# Altium PCB PCB.PcbDoc (part 4 of 5)
Units mm, origin at the board's own origin, x right, y up, seen from the top; angles counter-clockwise.
Board outline 101.6 x 53.34 mm, 6 copper layers (Top Layer, Int1 (GND), Int2, Int3, Int4 (GND), Bottom Layer), stack 1.625 mm thick; 228 components, 228 nets, 1016 pads, 995 vias.
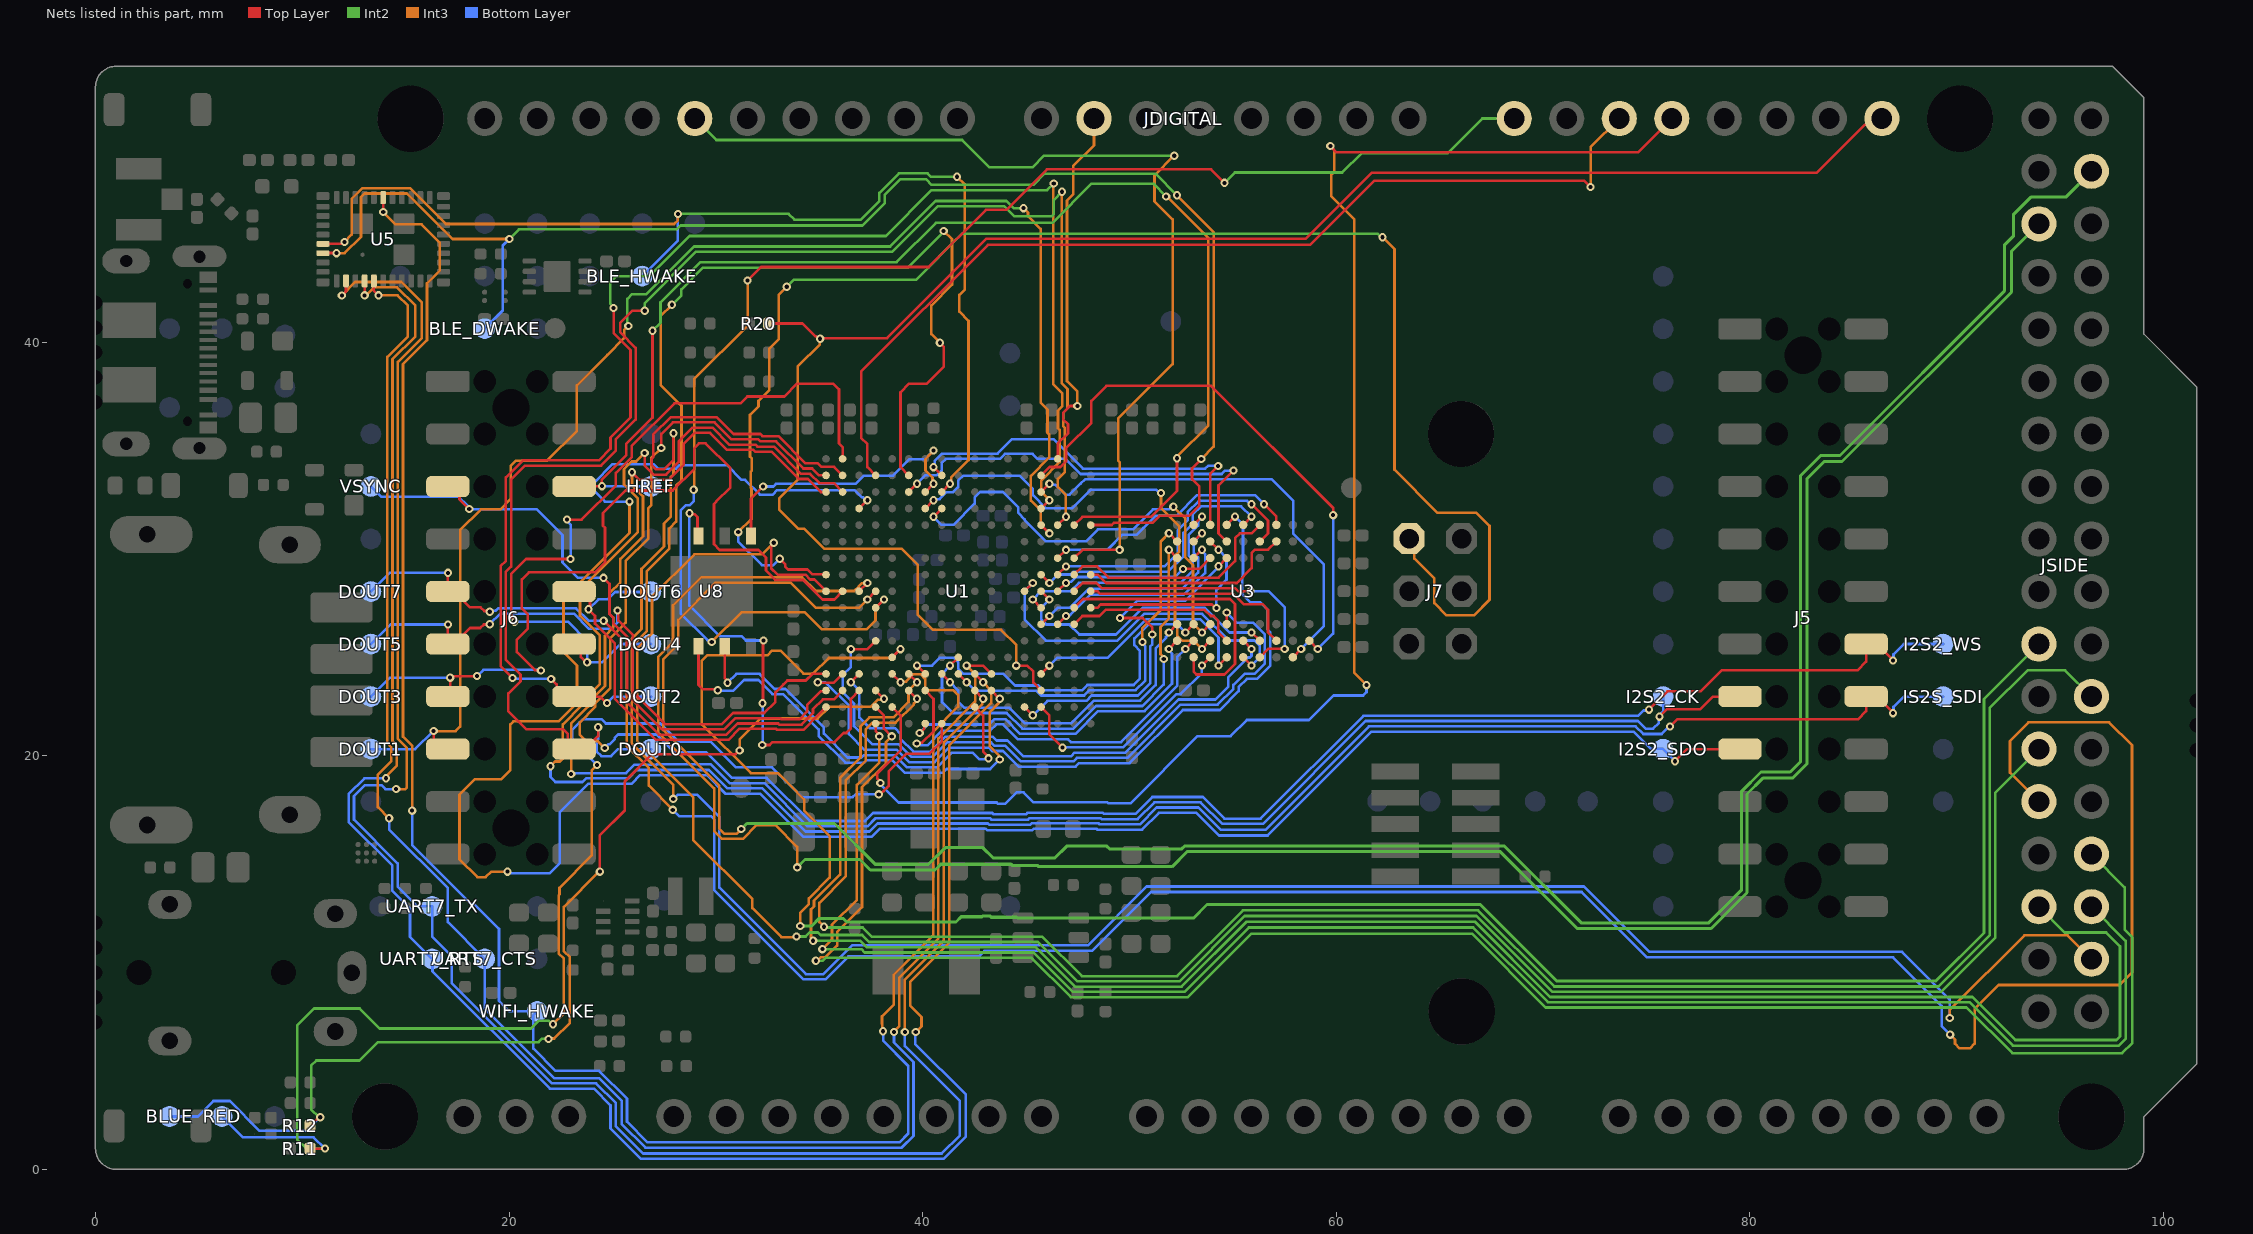
[diagram p8: the nets of this part, all layers, seen from the top]

## Via types
v1: diameter 0.4, hole 0.2, Top Layer to Bottom Layer, tented both sides, 995 vias

## Nets (pads, with @x,y where several pads share a name; then routed paths per layer and width w, separated by ;. In a path a pad name is that pad's centre, name@x,y a point inside that pad or via, vN(x,y) a via of type N, cw(c..) or ccw(c..) an arc to the next point about the centre after c; other vN are vias at no path point) (continued)
PD13: JDIGITAL.12 U1.R17 | length 18
  Top Layer w0.127: U1.R17@46.526,34.353 46.526,35.087 47.026,35.587 47.026,36.031 46.798,36.259 46.798,36.582 47.129,36.913 v1(47.482,36.913)
  Int3 w0.127: v1(47.482,36.913) 47.482,37.613 46.982,38.113 46.982,46.847 47.282,47.147 47.282,48.513 48.286,49.517 JDIGITAL.12@48.286,50.813
PD14_5: U1.P16 U3.A8 | length 27.1
  Top Layer w0.127: U1.P16@45.726,33.553 46.132,33.958 46.663,33.958 46.951,34.246 46.951,34.893 48.154,36.096 48.154,37.159 48.883,37.888 53.951,37.888 59.85,31.99 v1(59.85,31.633) ; U3.A8@58.704,25.56 v1(59.104,25.16)
  Bottom Layer w0.127: v1(59.104,25.16) 59.85,25.906 v1(59.85,31.633)
PD15_5: U1.P15 U3.B9 | length 22.1
  Top Layer w0.127: U1.P15@45.726,32.753 v1(46.126,33.153) ; U3.B9@57.904,24.76 v1(58.304,25.16)
  Bottom Layer w0.127: v1(46.126,33.153) 46.178,33.101 46.426,33.101 46.902,32.625 47.113,32.625 47.641,33.153 47.854,33.367 52.473,33.367 ; 52.473,33.366 56.881,33.366 57.913,32.334 57.913,30.747 59.404,29.257 59.404,26.26 v1(58.304,25.16)
PE0_5: U1.C4 U3.E8 | length 26.1
  Top Layer w0.127: v1(36.526,23.553) U1.C4@36.926,23.953 ; U3.E8@55.504,25.56 v1(55.904,25.16)
  Bottom Layer w0.127: v1(36.526,23.553) 36.936,23.144 36.936,21.84 37.441,21.334 38.658,21.334 38.936,21.056 38.936,20.817 39.555,20.198 40.374,20.198 41.098,20.921 43.384,20.921 43.571,20.734 44.104,20.734 44.859,19.98 47.187,19.98 47.354,20.147 49.799,20.147 52.372,22.72 54.161,22.72 54.773,23.332 54.773,23.781 55.742,24.75 55.829,24.75 55.904,24.825 v1(55.904,25.16)
PE1_5: U1.B4 U3.F1 | length 37.3
  Top Layer w0.127: v1(34.926,23.553) 34.951,23.528 35.702,23.528 U1.B4@36.126,23.953 ; U3.F1@54.704,31.16 v1(55.104,31.56)
  Bottom Layer w0.127: v1(34.926,23.553) 34.933,23.56 35.288,23.56 36.428,22.42 36.428,21.051 37.198,20.281 38.754,20.281 39.345,19.69 40.584,19.69 41.284,20.389 43.198,20.389 43.36,20.227 43.385,20.227 43.386,20.226 43.884,20.226 44.638,19.472 47.397,19.472 47.564,19.639 50.01,19.639 52.583,22.212 54.372,22.212 55.281,23.121 55.281,23.315 55.682,23.715 56.171,23.715 56.802,24.347 56.802,25.973 56.693,26.082 56.693,27.049 56.319,27.423 55.838,27.423 55.463,27.798 55.463,28.644 55.49,28.671 55.49,31.173 v1(55.104,31.56)
PE2_5: U1.C3 U8.3 | length 21.8
  Top Layer w0.127: v1(28.722,31.723) 28.774,31.67 28.982,31.67 29.113,31.54 29.113,30.671 U8.3@29.161,30.623 ; v1(32.242,20.515) 32.605,20.515 32.746,20.657 35.745,20.657 36.183,21.095 36.297,21.095 36.526,21.323 36.526,22.753 U1.C3@36.922,23.149 ; v1(32.259,22.539) 32.279,22.559 32.279,25.552 v1(32.3,25.572)
  Bottom Layer w0.127: v1(28.722,31.723) 28.722,27.257 30.206,25.773 31.252,25.773 31.453,25.572 v1(32.3,25.572) ; v1(32.242,20.515) 32.259,20.532 v1(32.259,22.539)
PE3: BLUE.X R12.2 U1.D3 | length 53.3
  Top Layer w0.127: R12.2@10.375,2.108 10.409,2.108 10.818,2.516 v1(10.867,2.516) ; v1(24.389,14.392) 24.389,16.154 25.594,17.36 25.594,18.745 26.919,20.071 30.958,20.071 31.138,20.25 v1(31.15,20.25) ; U1.D3@37.726,23.153 v1(38.126,22.753)
  Int2 w0.127: v1(10.867,2.516) 10.798,2.516 10.43,2.884 10.43,5.011 10.68,5.261 12.761,5.261 13.65,6.15 21.422,6.15 21.577,6.304 v1(21.904,6.304)
  Int3 w0.127: v1(21.904,6.304) 21.925,6.325 22.182,6.325 22.936,7.079 22.936,10.257 22.65,10.543 22.65,12.694 24.348,14.392 v1(24.389,14.392) ; v1(31.15,20.25) 31.15,20.792 32.157,21.798 34.922,21.798 35.486,22.362 37.488,22.362 37.827,22.701 38.075,22.701 v1(38.126,22.753)
  Bottom Layer w0.127: BLUE.X@3.582,2.553 4.953,2.553 5.7,3.3 6.5,3.3 7.938,1.862 10.213,1.862 v1(10.867,2.516)
PE4: JSIDE.30 U1.D2 | length 92.6
  Top Layer w0.127: U1.D2@37.726,22.353 38.126,21.953 38.126,21.314 v1(38.503,20.937)
  Int2 w0.127: v1(34.836,10.081) 35.163,10.081 35.31,10.227 45.26,10.227 47.165,8.323 52.823,8.323 55.897,11.397 66.555,11.397 70.128,7.825 90.48,7.825 92.689,5.615 98,5.615 98.5,6.115 98.5,11.215 98.126,11.589 98.126,13.633 JSIDE.30@96.52,15.239
  Int3 w0.127: v1(34.836,10.081) 34.909,10.081 35.082,10.254 35.312,10.254 35.868,10.811 35.868,11.473 37.068,12.673 37.068,18.476 38.226,19.635 38.226,20.66 v1(38.503,20.937)
PE5: JSIDE.32 U1.D1 | length 86.9
  Top Layer w0.127: U1.D1@37.726,21.553 37.726,21.185 37.903,21.008 v1(37.903,20.937)
  Int2 w0.127: v1(35.15,10.644) 37.036,10.644 37.199,10.481 45.366,10.481 47.27,8.577 52.658,8.577 55.775,11.693 66.619,11.693 70.233,8.079 90.617,8.079 92.72,5.976 97.84,5.976 98.177,6.312 98.177,11.042 JSIDE.32@96.52,12.699
  Int3 w0.127: v1(35.15,10.644) 35.614,11.109 35.614,11.829 36.814,13.029 36.814,18.581 37.903,19.671 v1(37.903,20.937)
PE6: JSIDE.21 U1.E5 | length 103.5
  Top Layer w0.127: U1.E5@38.526,24.753 v1(38.926,25.153)
  Int2 w0.15: v1(34.082,11.767) 34.631,11.767 34.995,12.131 36.149,12.131 36.322,11.958 41.609,11.958 41.863,12.211 42.868,12.211 42.914,12.258 43.247,12.258 43.317,12.188 44.536,12.188 44.579,12.144 53.095,12.144 53.752,12.801 66.964,12.801 70.652,9.113 89.005,9.113 91.322,11.429 91.322,22.74 JSIDE.21@93.98,25.399
  Int3 w0.127: v1(34.082,11.767) 34.082,12.409 34.492,12.818 34.492,13.098 35.5,14.106 35.5,16.109 34.271,17.338 34.271,17.888 33.933,18.226 33.933,18.236 33.109,19.059 33.099,19.059 33.001,19.158 31.691,19.158 29.311,21.537 29.311,24.591 29.576,24.856 32.5,24.856 32.723,25.079 33.127,25.079 34.236,23.97 34.708,23.97 35.461,24.723 38.496,24.723 v1(38.926,25.153)
PE7_5: U1.U9 U3.C8 | length 10.6
  Top Layer w0.127: U1.U9@48.126,27.953 48.445,27.953 48.562,27.836 55.017,27.836 55.522,27.331 56.423,27.331 56.699,27.055 56.699,25.964 U3.C8@57.104,25.56
PE8_5: U1.T9 U3.D9 | length 14.2
  Top Layer w0.127: U1.T9@47.326,27.953 47.726,28.353 48.217,28.353 48.404,28.353 48.667,28.09 55.122,28.09 55.253,27.96 v1(55.854,27.96) ; U3.D9@56.304,24.76 56.708,25.164 57.499,25.164 v1(57.504,25.16)
  Bottom Layer w0.127: v1(55.854,27.96) 56.723,27.96 57.512,27.171 57.512,25.168 v1(57.504,25.16)
PE9_5: U1.P9 U3.D8 | length 13.8
  Top Layer w0.127: U1.P9@45.726,27.953 v1(46.126,27.553) ; v1(55.904,25.96) U3.D8@56.304,25.56
  Bottom Layer w0.127: v1(46.126,27.553) 45.736,27.163 45.736,26.591 45.983,26.343 47.088,26.343 47.573,25.858 49.352,25.858 50.653,27.16 53.636,27.16 54.836,25.96 v1(55.904,25.96)
PE10_5: U1.N9 U3.E9 | length 17.1
  Top Layer w0.127: U1.N9@44.926,27.953 v1(45.326,28.353) ; U3.E9@55.504,24.76 v1(55.904,24.36)
  Bottom Layer w0.127: v1(45.326,28.353) 44.936,27.962 44.936,26.591 45.964,25.562 49.415,25.562 50.712,26.859 53.516,26.859 54.806,25.569 56.047,25.569 56.294,25.322 56.294,24.75 v1(55.904,24.36)
PE11_5: U1.P10 U3.E1 | length 13.6
  Top Layer w0.127: U1.P10@45.726,28.753 v1(46.126,28.353) ; U3.E1@55.504,31.16 v1(55.904,31.56)
  Bottom Layer w0.127: v1(46.126,28.353) 46.533,28.76 47.152,28.76 47.29,28.898 51.876,28.898 52.605,29.627 52.605,30.773 53.069,31.236 53.069,31.677 53.452,32.06 55.404,32.06 v1(55.904,31.56)
PE12_5: U1.R10 U3.D2 | length 14.1
  Top Layer w0.127: U1.R10@46.526,28.753 v1(46.926,29.153) ; v1(55.904,32.16) 56.699,31.364 56.699,30.755 U3.D2@56.304,30.36
  Bottom Layer w0.127: v1(46.926,29.153) 51.697,29.153 52.339,29.795 52.339,30.904 52.815,31.38 52.815,31.783 53.359,32.327 55.693,32.327 55.86,32.16 v1(55.904,32.16)
PE13_5: U1.T10 U3.D1 | length 11.1
  Top Layer w0.127: U1.T10@47.326,28.753 47.726,29.153 48.44,29.153 48.985,28.608 54.311,28.608 55.108,29.405 55.108,30.524 55.34,30.755 55.899,30.755 U3.D1@56.304,31.16
PE14_5: U1.U10 U3.C2 | length 10.4
  Top Layer w0.127: U1.U10@48.126,28.753 48.465,28.753 48.864,28.354 55.192,28.354 55.908,29.07 55.908,29.791 56.081,29.964 56.708,29.964 U3.C2@57.104,30.36
PE15_5: U1.R11 U3.C1 | length 12.7
  Top Layer w0.127: U1.R11@46.526,29.553 v1(46.926,29.953) ; v1(56.504,32.16) 57.104,31.56 U3.C1@57.104,31.16
  Bottom Layer w0.127: v1(46.926,29.953) 48.926,29.953 49.662,30.689 50.361,30.689 50.681,31.009 50.681,31.015 50.909,31.243 50.915,31.243 51.266,31.595 52.268,31.595 53.268,32.595 56.069,32.595 v1(56.504,32.16)
PF0_5: U1.G4 U3.H7 | length 18.1
  Top Layer w0.127: v1(39.726,24.353) U1.G4@40.126,23.953 ; v1(52.704,25.96) U3.H7@53.104,26.36
  Bottom Layer w0.127: v1(39.726,24.353) 40.449,24.353 40.839,24.743 41.488,24.743 41.728,24.504 41.728,24.199 41.967,23.96 43.904,23.96 44.466,23.397 45.593,23.397 45.828,23.162 47.703,23.162 47.961,23.42 50.199,23.42 50.505,23.726 50.505,25.072 50.236,25.341 50.236,25.665 50.549,25.978 ; 50.549,25.978 50.922,26.351 52.312,26.351 v1(52.704,25.96)
PF1_5: U1.G3 U3.H8 | length 20.2
  Top Layer w0.127: v1(39.717,20.588) 39.756,20.627 39.976,20.627 40.526,21.177 40.526,22.753 U1.G3@40.13,23.149 ; v1(52.704,25.16) U3.H8@53.104,25.56
  Bottom Layer w0.127: v1(39.717,20.588) 39.769,20.536 39.895,20.536 39.928,20.503 40.232,20.503 40.937,21.208 43.262,21.208 43.57,21.516 43.894,21.516 44.618,20.792 47.028,20.792 47.165,20.655 49.589,20.655 52.309,23.375 52.309,24.765 v1(52.704,25.16)
PF2_5: U1.G1 U3.J8 | length 16.7
  Top Layer w0.127: v1(39.855,21.1) 40.08,21.324 40.08,21.507 U1.G1@40.126,21.553 ; v1(51.904,25.16) U3.J8@52.304,25.56
  Bottom Layer w0.127: v1(39.855,21.1) 40.262,21.507 43.202,21.507 43.465,21.77 43.999,21.77 44.715,21.054 47.391,21.054 48.487,22.15 50.725,22.15 52.055,23.48 52.055,24.935 51.904,25.086 v1(51.904,25.16)
PF3_5: U1.H4 U3.J7 | length 15.8
  Top Layer w0.127: U1.H4@40.926,23.953 v1(41.326,23.553) ; v1(51.904,25.96) U3.J7@52.304,26.36
  Bottom Layer w0.127: v1(41.326,23.553) 41.717,23.162 41.717,22.61 42.007,22.32 44.184,22.32 44.942,21.562 47.181,21.562 48.276,22.658 50.515,22.658 51.267,23.411 51.267,25.191 51.768,25.692 51.768,25.75 51.904,25.886 v1(51.904,25.96)
PF4_5: U1.J5 U3.J3 | length 21.9
  Top Layer w0.127: v1(41.326,24.353) U1.J5@41.726,24.753 ; v1(51.904,29.96) U3.J3@52.304,29.56
  Int3 w0.127: v1(51.658,24.679) 51.658,24.753 51.498,24.912 51.498,26.219 51.904,26.624 v1(51.904,29.96)
  Bottom Layer w0.127: v1(41.326,24.353) 40.936,23.962 40.936,22.591 41.461,22.066 44.062,22.066 44.82,21.308 47.286,21.308 48.381,22.404 50.62,22.404 51.658,23.442 v1(51.658,24.679)
PF5_5: U1.J4 U3.J2 | length 18
  Top Layer w0.127: U1.J4@41.726,23.953 v1(42.126,23.553) ; v1(51.904,30.76) U3.J2@52.304,30.36
  Int3 w0.127: v1(50.626,25.503) 50.626,26.169 51.513,27.056 51.513,30.369 v1(51.904,30.76)
  Bottom Layer w0.127: v1(42.126,23.553) 42.536,23.143 45.488,23.143 45.723,22.908 47.808,22.908 48.066,23.166 50.304,23.166 50.759,23.621 50.759,25.296 50.626,25.429 v1(50.626,25.503)
PF6_5: U1.K2 U8.7 | length 19.9
  Top Layer w0.127: U8.7@30.431,25.283 30.431,23.74 30.567,23.604 v1(30.567,23.531) ; U1.K2@42.526,22.353 42.926,21.953 42.926,20.203 43.189,19.94 v1(43.189,19.871)
  Bottom Layer w0.127: v1(30.567,23.531) 30.997,23.961 32.111,23.961 32.844,23.228 33.362,23.228 35.221,21.369 35.221,21.066 36.372,19.915 37.044,19.915 37.156,20.027 38.64,20.027 39.231,19.436 40.69,19.436 41.389,20.135 42.431,20.135 42.735,19.83 43.149,19.83 v1(43.189,19.871)
PF7: U1.K3 U5.2 UART7_TX.X | length 97.1
  Top Layer w0.127: v1(11.914,42.258) 12.115,42.458 U5.2@12.115,42.96 ; U1.K3@42.526,23.153 v1(42.926,22.753)
  Int3 w0.127: v1(11.914,42.258) 12.562,42.905 14.795,42.905 15.78,41.92 15.78,40.197 14.62,39.036 14.62,20.816 15.058,20.378 15.058,18.459 14.983,18.384 v1(14.54,18.384) ; v1(39.139,6.634) 39.139,9.167 41.025,11.054 41.025,20.641 42.882,22.499 42.882,22.709 v1(42.926,22.753)
  Bottom Layer w0.127: v1(14.54,18.384) 14.021,18.384 13.83,18.575 13.025,18.575 12.5,18.049 12.5,16.907 14.613,14.794 14.613,13.676 15.577,12.713 UART7_TX.X@16.282,12.713 16.282,11.247 17.222,10.307 17.222,9.008 22.075,4.154 24.21,4.154 25.165,3.199 25.165,2.079 26.479,0.765 40.918,0.765 41.794,1.642 41.794,3.306 39.139,5.961 v1(39.139,6.634)
PF8: U1.K4 U5.4 UART7_RTS.X | length 96
  Top Layer w0.127: v1(13.015,42.26) U5.4@13.015,42.96 ; U1.K4@42.526,23.953 v1(42.926,23.553)
  Int3 w0.127: v1(13.015,42.26) 13.089,42.26 13.48,42.651 14.581,42.651 15.466,41.767 15.466,40.274 14.366,39.174 14.366,20.711 14.564,20.513 14.564,19.508 14.155,19.1 14.155,19.09 14.048,18.983 v1(14.048,18.909) ; v1(39.666,6.634) 39.947,6.916 39.947,7.362 39.393,7.916 39.393,9.062 41.279,10.948 41.279,20.501 43.317,22.538 43.317,23.162 v1(42.926,23.553)
  Bottom Layer w0.127: v1(14.048,18.909) 13.001,18.909 12.246,18.154 12.246,16.802 14.359,14.689 14.359,13.463 15.21,12.612 15.21,11.244 16.298,10.157 16.298,9.573 21.97,3.9 24.1,3.9 24.908,3.092 24.908,1.972 26.372,0.508 41.02,0.508 42.092,1.58 42.092,3.608 39.637,6.063 39.637,6.605 v1(39.666,6.634)
PF9: U1.L4 U5.5 UART7_CTS.X | length 90
  Top Layer w0.127: U5.5@13.465,42.96 13.465,42.481 v1(13.686,42.26) ; v1(42.126,24.353) 42.926,24.353 U1.L4@43.326,23.953
  Int3 w0.127: v1(13.686,42.26) 14.613,42.26 15.109,41.765 15.109,40.276 14.112,39.279 14.112,20.606 14.31,20.408 14.31,19.732 13.658,19.08 13.658,17.517 v1(14.2,16.975) ; v1(38.612,6.634) 38.612,6.66 38.874,6.921 38.874,9.277 40.76,11.163 40.76,20.835 42.536,22.61 42.536,23.943 v1(42.126,24.353)
  Bottom Layer w0.127: v1(14.2,16.975) 14.2,16.433 17.037,13.596 17.037,11.957 UART7_CTS.X@18.822,10.173 18.822,7.767 22.181,4.408 24.353,4.408 25.446,3.315 25.446,2.195 26.595,1.046 38.989,1.046 39.557,1.614 39.557,5.184 38.612,6.129 v1(38.612,6.634)
PF10_5: U1.L3 U8.6 | length 23
  Top Layer w0.127: U8.6@29.161,25.283 29.161,24.158 29.161,23.424 29.365,23.22 30.038,23.22 v1(30.09,23.167) ; U1.L3@43.326,23.153 v1(43.726,22.753)
  Int3 w0.127: v1(43.726,19.815) 43.674,19.867 43.674,20.027 43.245,20.456 43.245,22.108 43.674,22.536 43.674,22.701 v1(43.726,22.753)
  Bottom Layer w0.127: v1(30.09,23.167) 30.118,23.14 30.835,23.14 31.358,23.663 32.05,23.663 32.739,22.974 33.257,22.974 34.967,21.264 34.967,20.961 36.267,19.661 37.178,19.661 37.29,19.773 38.534,19.773 39.126,19.182 40.986,19.182 41.158,19.354 43.265,19.354 v1(43.726,19.815)
PF11_5: U1.T7 U3.F8 | length 8.6
  Top Layer w0.127: U1.T7@47.326,26.353 47.726,26.753 48.547,26.753 48.85,27.056 53.636,27.056 53.937,26.755 54.068,26.755 54.299,26.524 54.299,25.964 U3.F8@54.704,25.56
PF12_5: U1.R7 U3.H3 | length 9.9
  Top Layer w0.127: U1.R7@46.526,26.353 v1(46.926,26.753) ; U3.H3@53.104,29.56 v1(53.504,29.96)
  Bottom Layer w0.127: v1(46.926,26.753) 46.978,26.805 47.129,26.805 48.103,27.779 52.61,27.779 53.659,28.828 53.659,29.749 53.504,29.904 v1(53.504,29.96)
PF13_5: U1.P7 U3.H2 | length 11.4
  Top Layer w0.127: U1.P7@45.726,26.353 v1(46.126,26.753) ; U3.H2@53.104,30.36 v1(53.504,30.76)
  Bottom Layer w0.127: v1(46.126,26.753) 46.533,27.16 47.124,27.16 48.03,28.066 52.538,28.066 53.326,28.854 53.326,29.586 53.113,29.798 53.113,30.369 v1(53.504,30.76)
PF14_5: U1.P8 U3.H1 | length 12.4
  Top Layer w0.127: v1(45.326,27.553) U1.P8@45.726,27.153 ; U3.H1@53.104,31.16 v1(53.504,31.56)
  Bottom Layer w0.127: v1(45.326,27.553) 45.726,27.953 47.149,27.953 47.557,28.361 52.474,28.361 53.061,28.948 53.061,29.491 52.859,29.693 52.859,30.668 53.323,31.131 53.323,31.316 53.504,31.497 v1(53.504,31.56)
PF15_5: U1.R9 U3.G3 | length 8
  Top Layer w0.127: U1.R9@46.526,27.953 v1(46.926,28.353) ; v1(52.593,29.032) 53.376,29.032 U3.G3@53.904,29.56
  Bottom Layer w0.127: v1(46.926,28.353) 46.978,28.405 47.169,28.405 47.408,28.644 52.204,28.644 v1(52.593,29.032)
PG0_5: U1.T8 U3.H9 | length 13.9
  Top Layer w0.127: U1.T8@47.326,27.153 47.751,27.577 54.855,27.577 55.103,27.33 55.103,24.441 54.587,23.926 53.238,23.926 53.104,24.06 U3.H9@53.104,24.76
PG1_5: U1.U8 U3.G2 | length 10
  Top Layer w0.127: U1.U8@48.126,27.153 48.45,27.153 48.607,27.31 53.994,27.31 54.161,27.143 v1(54.205,27.143) ; U3.G2@53.904,30.36 v1(54.304,29.96)
  Bottom Layer w0.127: v1(54.205,27.143) 54.205,28.025 54.694,28.514 54.694,29.569 v1(54.304,29.96)
PG2_5: U1.H16 U3.G1 | length 18.7
  Top Layer w0.127: v1(40.526,33.953) U1.H16@40.926,33.553 ; U3.G1@53.904,31.16 53.904,33.626 v1(54.289,34.011)
  Bottom Layer w0.127: v1(40.526,33.953) 40.578,34.005 40.578,34.253 40.935,34.61 43.624,34.61 44.323,35.309 46.316,35.309 47.749,33.876 53.665,33.876 53.805,34.016 54.283,34.016 v1(54.289,34.011)
PG3: BLE_HWAKE.X U1.H15 U5.38 | length 55.2
  Top Layer w0.127: U5.38@11,44.75 11.872,44.75 11.963,44.841 v1(12.037,44.841) ; U1.H15@40.926,32.753 v1(41.326,33.153)
  Int2 w0.127: v1(28.165,46.2) 33.515,46.2 33.797,45.918 37.008,45.918 37.906,46.816 37.906,47.22 38.849,48.163 40.238,48.163 40.407,47.994 v1(41.664,47.994)
  Int3 w0.127: v1(12.037,44.841) 12.388,45.192 12.388,46.919 12.912,47.442 15.212,47.442 16.945,45.709 27.983,45.709 28.165,45.891 v1(28.165,46.2) ; v1(41.326,33.153) 41.378,33.205 41.378,33.453 42.216,34.291 42.216,41.025 41.77,41.471 41.77,42.277 42.036,42.543 42.036,47.622 v1(41.664,47.994)
  Bottom Layer w0.127: BLE_HWAKE.X@26.442,43.193 28.165,44.916 v1(28.165,46.2)
PG4_5: U1.H14 U3.G7 | length 22.2
  Top Layer w0.127: v1(40.526,31.553) U1.H14@40.926,31.953 ; v1(53.504,25.96) U3.G7@53.904,26.36
  Int3 w0.127: v1(52.122,32.036) 52.698,31.46 52.698,29.592 53.075,29.215 53.075,26.389 v1(53.504,25.96)
  Bottom Layer w0.127: v1(40.526,31.553) 40.917,31.162 41.488,31.162 42.517,32.191 42.517,32.496 42.774,32.753 43.878,32.753 44.626,32.005 44.626,31.741 44.936,31.432 44.936,31.391 45.964,30.362 47.888,30.362 48.469,30.943 50.166,30.943 51.135,31.912 51.924,31.912 52.048,32.036 v1(52.122,32.036)
PG5_5: U1.G14 U3.G8 | length 22.9
  Top Layer w0.127: U1.G14@40.126,31.953 v1(40.526,32.353) ; v1(53.504,25.16) U3.G8@53.904,25.56
  Int3 w0.127: v1(51.526,32.703) 51.526,31.97 52.408,31.087 52.408,29.885 52.202,29.679 52.202,26.334 52.313,26.223 52.313,25.798 52.561,25.55 53.113,25.55 v1(53.504,25.16)
  Bottom Layer w0.127: v1(40.526,32.353) 40.578,32.405 40.826,32.405 41.164,32.743 41.469,32.743 41.717,32.991 41.717,33.296 41.964,33.543 44.688,33.543 45.326,32.905 45.326,32.601 45.964,31.962 46.298,31.962 47.215,31.962 48.111,32.859 51.297,32.859 51.452,32.703 v1(51.526,32.703)
PG6_5: U1.G15 U8.1 | length 14.1
  Top Layer w0.127: U8.1@31.701,30.623 31.701,31.748 ; 31.7,31.748 31.7,32.431 v1(32.286,33.017) ; U1.G15@40.126,32.753 v1(40.526,33.153)
  Int3 w0.127: v1(40.526,33.153) 40.474,33.205 40.474,33.453 40.136,33.791 40.136,34.347 40.278,34.489 40.278,34.504 v1(40.526,34.753)
  Bottom Layer w0.127: v1(32.286,33.017) 32.785,33.017 32.91,33.142 36.763,33.142 37.164,33.543 38.573,33.543 39.373,34.343 40.117,34.343 v1(40.526,34.753)
PG7: JSIDE.34 U1.F16 | length 136.9
  Top Layer w0.127: U1.F16@39.326,33.553 38.926,33.953 38.926,37.571 39.343,37.988 40.201,37.988 41.016,38.803 41.016,39.782 v1(40.831,39.969) v1(40.831,39.969)
  Int2 w0.127: v1(27.873,41.804) 28.329,42.26 28.329,42.541 29.387,43.599 39.283,43.599 41.016,45.331 v1(41.016,45.378)
  Int3 w0.127: 26.301,25.663 25.936,25.298 25.936,20.578 27.942,18.573 v1(27.942,17.913) ; 26.301,25.664 26.66,26.022 26.66,28.928 27.748,30.015 27.748,30.996 28.077,31.326 28.077,33.054 28.339,33.316 28.339,36.914 27.328,37.925 27.328,41.259 v1(27.873,41.804) ; v1(40.831,39.969) 40.416,40.384 40.416,41.778 41.416,42.778 41.416,44.978 v1(41.016,45.378) ; v1(89.666,7.313) 89.666,7.699 93.276,11.31 95.369,11.31 JSIDE.34@96.52,10.159
  Bottom Layer w0.127: v1(27.942,17.913) 27.961,17.913 28.152,18.105 29.102,18.105 30.168,17.038 30.168,13.618 34.35,9.437 35.199,9.437 36.593,10.83 47.986,10.83 50.833,13.677 71.978,13.677 75.138,10.516 87.357,10.516 89.666,8.207 v1(89.666,7.313)
PG8_5: U1.F15 U3.F2 | length 21
  Top Layer w0.127: U1.F15@39.326,32.753 v1(39.726,33.153) ; U3.F2@54.704,30.36 54.308,30.755 54.308,33.07 v1(55.026,33.788)
  Bottom Layer w0.127: v1(39.726,33.153) 40.136,33.562 40.688,33.562 40.917,33.791 40.917,34.155 41.117,34.356 43.729,34.356 43.971,34.597 45.32,34.597 45.562,34.356 46.911,34.356 47.644,33.622 52.576,33.622 52.579,33.62 54.456,33.62 54.624,33.788 v1(55.026,33.788)
PG9: J7.1 U1.A10 | length 76.2
  Top Layer w0.127: v1(33.093,29.526) 33.354,29.265 33.354,29.146 33.494,29.006 34.432,29.006 34.665,28.772 35.307,28.772 U1.A10@35.326,28.753
  Int2 w0.127: v1(33.429,42.68) 33.764,43.014 39.667,43.014 41.894,45.241 61.999,45.241 62.168,45.073 v1(62.242,45.073)
  Int3 w0.127: v1(31.081,30.809) 31.721,31.449 31.721,32.942 31.683,32.979 31.683,33.738 31.736,33.79 31.736,34.378 31.652,34.462 31.652,36.481 32.062,36.891 32.062,37.156 32.584,37.677 32.584,39.689 33.047,40.152 33.047,42.297 v1(33.429,42.68) ; v1(62.242,45.073) 62.817,44.497 62.817,33.831 64.903,31.745 66.776,31.745 67.41,31.111 67.41,27.541 66.652,26.783 65.331,26.783 64.742,27.373 64.742,28.573 63.779,29.535 63.779,30.239 J7.1@63.526,30.493
  Bottom Layer w0.127: v1(31.081,30.809) 31.081,30.358 32.228,29.211 32.777,29.211 v1(33.093,29.526)
PG10: JSIDE.25 U1.A9 | length 104.7
  Top Layer w0.127: v1(32.8,30.3) 32.8,30.226 32.678,30.104 32.678,29.059 32.986,28.752 34.327,28.752 34.56,28.518 34.761,28.518 U1.A9@35.326,27.953
  Int2 w0.127: v1(33.896,11.258) 34.344,11.258 34.539,11.452 34.932,11.452 35.057,11.327 37.071,11.327 37.409,10.989 45.576,10.989 47.48,9.085 52.412,9.085 55.574,12.247 66.783,12.247 70.443,8.587 89.263,8.587 91.874,11.198 91.874,18.213 JSIDE.25@93.98,20.319
  Int3 w0.127: 26.555,25.558 26.19,25.193 26.19,20.707 28.898,17.999 28.898,15.934 31.765,13.067 31.765,12.63 33.172,11.222 33.86,11.222 v1(33.896,11.258) ; 26.555,25.559 26.914,25.917 26.914,27.692 28.959,29.737 32.237,29.737 v1(32.8,30.3)
PG11: DOUT3.X J6.13 U1.B9 | length 42.4
  Top Layer w0.127: J6.13@17.042,22.859 17.151,22.967 v1(17.151,23.776) 17.225,23.85 v1(18.45,23.85) ; v1(21.537,24.12) 21.523,24.134 21.252,24.134 20.374,25.012 20.374,25.612 20.905,26.142 20.905,26.831 20.622,27.114 20.622,28.523 20.965,28.867 24.151,28.867 24.637,29.353 24.637,31.023 24.542,31.118 24.542,31.734 25.636,32.827 27.91,32.827 28.958,33.876 28.958,34.875 29.187,35.104 29.511,35.104 30.699,33.916 30.699,32.976 30.017,32.294 30.017,32.276 29.909,32.169 29.909,30.225 30.185,29.949 32.053,29.949 32.424,29.577 32.424,28.954 32.881,28.498 34.221,28.498 35.166,27.553 35.726,27.553 U1.B9@36.126,27.953
  Bottom Layer w0.127: DOUT3.X@13.322,22.859 14.239,23.776 v1(17.151,23.776) ; v1(18.45,23.85) 18.752,24.152 21.505,24.152 v1(21.537,24.12)
PG12: JSIDE.5 U1.C9 | length 117.7
  Top Layer w0.127: U1.C9@36.926,27.953 v1(37.326,28.353)
  Int2 w0.15: v1(33.933,14.6) 34.312,14.98 36.966,14.98 37.473,14.473 40.599,14.473 40.876,14.75 41.882,14.75 ; 41.883,14.751 44.28,14.751 44.35,14.681 45.568,14.681 45.612,14.637 52.062,14.637 52.784,15.359 67.932,15.359 71.65,11.641 78.129,11.641 79.866,13.378 79.866,14.309 79.866,18.147 80.631,18.913 82.066,18.913 82.755,19.602 82.755,33.382 83.597,34.224 84.459,34.224 92.654,42.419 92.654,44.392 JSIDE.5@93.98,45.719
  Int3 w0.127: v1(33.933,14.6) 33.933,15.588 32.88,16.641 31.973,16.641 31.309,15.977 30.292,15.977 29.914,16.355 29.914,18.42 27.206,21.128 27.206,24.772 27.571,25.137 27.93,25.496 27.93,27.271 29.285,28.626 34.173,28.626 34.836,27.963 36.688,27.963 36.917,28.191 36.917,28.2 37.049,28.332 37.305,28.332 v1(37.326,28.353)
PG13: JSIDE.4 U1.D9 | length 120.4
  Top Layer w0.127: v1(37.326,27.553) U1.D9@37.726,27.953
  Int2 w0.15: v1(31.23,16.451) 31.5,16.721 35.739,16.721 37.709,14.75 40.282,14.75 41.086,15.554 42.906,15.554 43.398,15.062 46.398,15.062 46.964,15.628 48.904,15.628 49.037,15.495 52.528,15.495 52.669,15.636 68.125,15.636 71.843,11.918 78.014,11.918 79.589,13.493 79.589,18.262 80.54,19.213 81.949,19.213 82.455,19.718 82.455,33.548 83.426,34.519 84.363,34.519 92.306,42.463 92.306,44.682 92.742,45.118 92.742,46.164 93.59,47.013 95.274,47.013 JSIDE.4@96.52,48.259
  Int3 w0.127: 27.825,25.032 27.46,24.667 27.46,21.233 30.168,18.525 30.168,16.46 30.397,16.231 31.01,16.231 v1(31.23,16.451) ; 27.825,25.032 28.184,25.391 28.184,26.569 29.987,28.372 33.612,28.372 34.821,27.162 36.936,27.162 v1(37.326,27.553)
PG14: JDIGITAL.19 U1.D8 | length 71.3
  Top Layer w0.127: v1(31.534,42.977) 32.189,43.632 40.287,43.632 43.052,46.397 44.05,46.397 46.005,48.352 53.948,48.352 v1(54.6,47.7) ; U1.D8@37.726,27.153 v1(38.126,27.553)
  Int2 w0.127: v1(54.6,47.7) 55.1,48.2 60.288,48.2 61.234,49.146 65.394,49.146 67.06,50.813 JDIGITAL.19@68.606,50.813
  Int3 w0.127: v1(28.925,32.859) 28.952,32.886 28.952,38.214 31.543,40.805 31.543,42.968 v1(31.534,42.977) ; v1(29.8,25.5) 31.232,26.932 34.301,26.932 35.125,26.108 37.282,26.108 37.717,26.543 37.717,27.143 v1(38.126,27.553)
  Bottom Layer w0.127: v1(28.925,32.859) 28.925,32.299 28.739,32.113 28.56,32.113 28.295,31.849 28.295,26.883 29.59,25.588 29.638,25.588 29.726,25.5 v1(29.8,25.5)
PG15_5: U1.D6 U3.F7 | length 33
  Top Layer w0.127: v1(36.526,25.153) 37.326,25.153 U1.D6@37.726,25.553 ; U3.F7@54.704,26.36 v1(54.704,26.925)
  Bottom Layer w0.127: v1(36.526,25.153) 36.526,24.285 36.136,23.895 36.136,23.072 36.682,22.526 36.682,21.429 37.564,20.546 38.847,20.546 39.45,19.944 40.479,19.944 41.178,20.643 42.641,20.643 43.303,20.643 43.466,20.48 43.999,20.48 44.754,19.726 47.292,19.726 47.459,19.893 49.904,19.893 52.478,22.466 54.266,22.466 55.027,23.227 55.027,23.42 55.577,23.969 56.066,23.969 56.548,24.452 56.548,25.868 55.991,26.425 55.204,26.425 v1(54.704,26.925)
PH2_5: U1.N2 U3.F3 | length 17.8
  Top Layer w0.127: U1.N2@44.926,22.353 v1(45.326,21.953) ; v1(49.545,26.66) 50.639,26.66 51.104,26.195 v1(51.104,25.86) ; v1(54.304,29.16) U3.F3@54.704,29.56
  Bottom Layer w0.127: v1(45.326,21.953) 46.028,22.654 47.913,22.654 48.171,22.912 50.409,22.912 51.013,23.516 51.013,25.296 51.104,25.387 v1(51.104,25.86) ; v1(49.545,26.66) 50.373,27.488 52.679,27.488 54.304,29.113 v1(54.304,29.16)
PH3_5: U1.P2 U3.G9 | length 11.5
  Top Layer w0.127: U1.P2@45.726,22.353 46.117,21.962 46.117,21.039 v1(46.767,20.388) ; v1(53.504,24.36) U3.G9@53.904,24.76
  Bottom Layer w0.127: v1(46.767,20.388) 46.779,20.401 49.694,20.401 52.267,22.974 52.47,22.974 53.504,24.008 v1(53.504,24.36)
PH4: JDIGITAL.26 R20.1 U1.P3 | length 86.2
  Top Layer w0.127: R20.1@32.56,40.898 34.191,40.898 34.811,40.279 34.85,40.279 34.969,40.159 v1(35.043,40.159) ; v1@35.043,40.188 38.28,40.188 43.092,45 58.528,45 61.722,48.194 83.243,48.194 85.561,50.512 86.085,50.512 JDIGITAL.26@86.386,50.813 ; v1(44.526,24.353) 45.057,24.353 45.351,24.06 45.351,23.528 U1.P3@45.726,23.153
  Int3 w0.127: v1(35.043,40.159) 35.025,40.141 35.025,39.896 33.964,38.835 33.964,33.348 33.064,32.448 33.064,31.896 33.977,30.983 34.264,30.983 35.235,30.013 38.966,30.013 39.766,29.213 39.766,26.813 40.493,26.085 43.793,26.085 44.526,25.352 v1(44.526,24.353)
PH5_5: U1.P4 U3.F9 | length 12
  Top Layer w0.127: U1.P4@45.726,23.953 v1(46.126,24.353) ; v1(54.304,24.36) U3.F9@54.704,24.76
  Bottom Layer w0.127: v1(46.126,24.353) 46.517,24.743 48.955,24.743 50.817,26.605 53.41,26.605 54.304,25.712 v1(54.304,24.36)
PH6: JDIGITAL.5 U1.T11 | length 47.7
  Top Layer w0.127: U1.T11@47.326,29.553 47.726,29.953 v1(49.526,29.953)
  Int2 w0.127: JDIGITAL.5@28.982,50.813 30.022,49.772 41.906,49.772 43.225,48.453 45.306,48.453 45.866,49.013 v1(52.166,49.013)
  Int3 w0.127: v1(49.526,29.953) 49.526,34.198 49.467,34.257 49.467,36.318 52.087,38.938 52.087,45.931 51.211,46.807 51.211,48.058 v1(52.166,49.013)
PH7: BLE_DWAKE.X U1.U13 U5.39 | length 73.5
  Top Layer w0.127: U1.U13@48.126,31.153 49.135,31.153 49.246,31.263 51.118,31.263 51.449,31.595 52.868,31.595 53.376,32.103 53.376,33.026 53.025,33.376 53.025,33.898 v1(53.473,34.345)
  Top Layer w0.15: U5.39@11,44.3 v1(11.65,44.3)
  Int2 w0.127: v1(20.013,44.988) 20.48,45.455 28.104,45.455 28.291,45.642 37.091,45.642 38.16,46.711 38.16,47.115 38.914,47.868 40.174,47.868 40.438,47.604 45.357,47.604 45.895,48.142 51.258,48.142 v1(52.3,47.1)
  Int3 w0.127: v1(11.65,44.3) 12.048,44.3 12.842,45.093 12.842,47.013 13.017,47.188 15.066,47.188 17.266,44.988 v1(20.013,44.988) ; v1(52.3,47.1) 52.3,47.085 54.07,45.315 54.07,34.943 v1(53.473,34.345)
  Bottom Layer w0.127: BLE_DWAKE.X@18.822,40.653 19.694,41.525 19.694,44.67 v1(20.013,44.988)
PH8: HREF.X J6.6 U1.T13 | length 62.3
  Top Layer w0.127: J6.6@23.142,33.019 23.689,33.019 23.706,33.035 v1(24.491,33.035) 24.491,33.352 25.666,34.528 25.666,35.074 26.937,36.345 v1(26.937,40.55) ; U1.T13@47.326,31.153 47.726,31.553 51.048,31.553 52.301,32.806 v1(52.301,34.386)
  Int2 w0.127: v1(26.937,40.55) 27.321,40.934 27.321,41.924 29.261,43.864 38.743,43.864 40.648,45.768 46.282,45.768 48.174,47.66 51.159,47.66 v1(51.776,47.043)
  Int3 w0.127: v1(51.776,47.043) 51.805,47.043 53.816,45.032 53.816,35.974 52.301,34.46 v1(52.301,34.386)
  Bottom Layer w0.127: v1(24.491,33.035) 26.845,33.035 HREF.X@26.862,33.019
PH9: DOUT0.X J6.16 U1.R13 | length 76.5
  Top Layer w0.127: v1(24.308,21.377) 24.308,20.944 23.682,20.319 22.842,20.319 22.846,20.323 22.846,21.054 22.628,21.272 20.836,21.272 19.963,22.145 19.963,23.007 20.555,23.6 20.555,23.923 19.846,24.632 19.846,28.9 20.097,29.151 20.097,33.351 20.776,34.029 24.45,34.029 25.158,34.738 25.158,35.285 26.125,36.251 26.125,39.723 25.379,40.469 25.379,40.939 25.958,41.518 v1(26.562,41.518) ; U1.R13@46.526,31.153 v1(46.926,31.553)
  Int2 w0.127: v1(26.562,41.518) 26.562,41.882 29.051,44.372 38.533,44.372 40.729,46.568 43.946,46.568 44.43,46.084 45.678,46.084 45.68,46.082 46.229,46.082 46.342,46.196 46.342,46.874 v1(46.742,47.273)
  Int3 w0.127: v1(46.742,47.273) 46.728,47.259 46.728,38.007 47.002,37.733 47.002,36.786 46.798,36.582 46.798,35.935 46.879,35.854 46.879,33.721 46.536,33.378 46.536,32.991 46.926,32.601 v1(46.926,31.553)
  Bottom Layer w0.127: v1(24.308,21.377) 24.308,20.793 24.233,20.719 24.233,20.209 24.462,19.98 24.928,19.98 25.267,20.319 DOUT0.X@26.862,20.319
PH10: DOUT1.X J6.15 U1.P13 | length 70.6
  Top Layer w0.127: v1(16.355,21.191) 16.355,20.751 16.786,20.319 J6.15@17.042,20.319 J6.15@17.227,20.319 ; U1.P13@45.726,31.153 v1(46.126,30.753)
  Int2 w0.127: v1(25.769,40.777) 25.72,40.826 25.72,42.092 25.949,42.32 26.64,42.32 28.946,44.626 38.427,44.626 40.624,46.822 44.051,46.822 44.397,46.476 v1(44.88,46.476)
  Int3 w0.127: v1(16.355,21.191) 17.416,21.191 17.634,21.41 17.634,30.91 18.636,31.912 19.574,31.912 20.074,32.412 20.074,34.012 20.331,34.268 21.831,34.268 23.274,35.712 23.274,37.903 24.756,39.385 25.567,40.196 25.567,40.575 v1(25.769,40.777) ; v1(44.88,46.476) 45.095,46.262 45.095,46.091 45.708,45.479 45.708,37.072 46.036,36.744 46.036,35.619 46.117,35.539 46.117,34.414 45.228,33.525 45.228,32.34 45.717,31.851 45.717,31.162 v1(46.126,30.753)
  Bottom Layer w0.127: DOUT1.X@13.322,20.319 15.462,20.319 16.335,21.191 v1(16.355,21.191)
PH11: DOUT2.X J6.14 U1.P14 | length 71.8
  Top Layer w0.127: v1(20.165,23.761) 19.592,24.334 19.592,29.166 19.843,29.417 19.843,33.456 20.67,34.283 24.344,34.283 24.904,34.843 24.904,35.39 25.871,36.356 25.871,39.618 25.055,40.434 v1(25.055,41.65) ; v1(22.036,23.708) 22.301,23.443 22.301,23.291 22.733,22.859 J6.14@22.842,22.859 ; J6.14@23.142,22.859 24.398,22.859 24.706,22.55 v1(24.731,22.55) ; U1.P14@45.726,31.953 v1(46.126,32.353)
  Int2 w0.127: v1(25.055,41.65) 25.055,41.691 24.889,41.856 24.889,42.875 25.204,43.191 26.792,43.191 28.735,45.134 38.217,45.134 40.433,47.35 46.019,47.35 v1(46.342,47.673)
  Int3 w0.127: v1(46.126,32.353) 45.736,32.744 45.736,33.315 46.625,34.204 46.625,35.749 46.544,35.83 46.544,36.687 46.748,36.892 46.748,37.53 46.308,37.97 46.308,47.639 v1(46.342,47.673)
  Bottom Layer w0.127: v1(20.165,23.761) 20.197,23.729 22.014,23.729 v1(22.036,23.708) ; v1(24.731,22.55) 25.04,22.859 DOUT2.X@26.862,22.859
PH13: JDIGITAL.21 U1.D16 | length 48.4
  Top Layer w0.127: U1.D16@37.726,33.553 37.326,33.953 37.326,35.075 37.03,35.371 37.03,38.579 43.151,44.7 58.728,44.7 61.83,47.802 71.998,47.802 v1(72.3,47.5)
  Int3 w0.127: v1(72.3,47.5) 72.3,49.427 JDIGITAL.21@73.686,50.813
PH14: DOUT4.X J6.12 U1.B17 | length 37.2
  Top Layer w0.127: v1(20.26,26.48) 20.26,26.554 20.1,26.714 20.1,28.795 20.817,29.512 v1(22.974,29.512) ; v1(22.801,31.421) 22.811,31.412 23.502,31.412 25.167,33.077 25.167,33.669 25.929,34.431 25.929,34.977 27.994,37.042 31.198,37.042 31.526,37.371 33.309,37.371 33.926,37.988 35.676,37.988 35.951,37.713 35.951,35.101 36.14,34.912 36.14,34.367 U1.B17@36.126,34.353 ; J6.12@23.036,25.399 23.468,24.967 23.468,24.773 23.725,24.516 v1(23.774,24.516)
  Bottom Layer w0.127: v1(20.26,26.48) 22.843,26.48 23.774,25.549 v1(23.774,24.516) 24.499,24.516 25.382,25.399 DOUT4.X@26.862,25.399 ; v1(22.801,31.421) 22.801,31.347 22.974,31.174 v1(22.974,29.512)
PH15: JSIDE.27 U1.B16 | length 140.1
  Top Layer w0.127: v1(27.949,35.592) 27.942,35.586 27.942,34.297 27.489,33.843 27.1,33.843 26.904,34.039 26.904,34.362 26.972,34.43 26.972,35.526 27.819,36.374 30.037,36.374 30.858,35.553 32.155,35.553 32.254,35.454 33.02,35.454 34.333,34.142 34.935,34.142 35.111,33.966 35.713,33.966 U1.B16@36.126,33.553
  Int3 w0.127: v1(27.914,17.383) 27.914,17.388 26.755,18.547 26.755,19.4 25.682,20.472 25.682,25.403 26.047,25.768 26.406,26.127 26.406,29.033 27.494,30.12 27.494,31.227 27.823,31.557 27.823,33.475 27.949,33.6 v1(27.949,35.592) ; v1(89.686,6.511) 89.921,6.276 89.921,6.072 90.145,5.849 90.645,5.849 90.868,6.072 90.868,7.741 92.036,8.91 97.877,8.91 98.477,9.51 98.477,20.51 97.377,21.61 93.477,21.61 92.577,20.71 92.577,19.181 JSIDE.27@93.98,17.779
  Bottom Layer w0.127: v1(27.914,17.383) 28.233,17.064 29.784,17.064 29.914,16.933 29.914,13.513 34.245,9.183 35.304,9.183 36.415,10.294 42.72,10.294 42.992,10.565 46.559,10.565 ; 46.559,10.571 48.201,10.571 51.04,13.409 71.867,13.409 75.028,10.248 86.922,10.248 89.275,7.895 89.275,6.922 v1(89.686,6.511)
PI0: I2S2_WS.X J5.14 U1.A16 | length 99.5
  Top Layer w0.127: v1(27.362,34.884) 27.362,35.558 27.925,36.12 29.932,36.12 30.752,35.299 32.05,35.299 32.149,35.2 32.915,35.2 34.228,33.888 34.66,33.888 34.995,33.553 U1.A16@35.326,33.553 ; v1(75.12,22.227) 76.009,23.115 77.619,23.115 78.634,24.13 85.198,24.13 85.625,24.558 J5.14@85.625,25.399 86.145,25.399 86.925,24.619 v1(86.925,24.599)
  Int3 w0.127: v1(24.624,20.371) 24.281,20.713 23.71,20.713 23.419,21.004 23.419,21.616 24.157,22.354 24.157,22.528 24.895,23.266 24.895,25.693 25.285,26.084 ; 25.285,26.085 25.637,26.436 25.637,29.409 26.731,30.503 26.731,31.973 26.868,32.11 26.868,34.39 v1(27.362,34.884)
  Bottom Layer w0.127: v1(24.624,20.371) 24.813,20.56 24.877,20.56 25.105,20.788 25.105,20.852 25.279,21.026 27.132,21.026 27.983,20.174 29.525,20.174 30.769,18.93 32.456,18.93 34.546,16.84 37.22,16.84 37.609,17.229 43.367,17.229 43.435,17.162 44.988,17.162 45.064,17.237 48.714,17.237 48.766,17.185 50.291,17.185 51.108,18.002 53.549,18.002 54.593,16.959 56.343,16.959 61.313,21.929 74.6,21.929 74.86,22.188 75.082,22.188 v1(75.12,22.227) ; v1(86.925,24.599) 86.946,24.62 86.946,24.899 87.446,25.399 I2S2_WS.X@89.345,25.399
PI1: I2S2_CK.X J5.15 U1.A15 | length 92
  Top Layer w0.127: v1(25.947,33.704) 26.316,33.335 27.699,33.335 28.45,34.086 28.45,35.086 28.977,35.612 29.721,35.612 30.542,34.791 31.809,34.791 31.908,34.692 32.705,34.692 34.017,33.38 34.45,33.38 35.076,32.753 U1.A15@35.326,32.753 ; v1(75.627,21.889) 75.978,22.24 77.596,22.24 78.215,22.859 J5.15@79.825,22.859
  Int3 w0.127: v1(23.002,19.119) 23.002,21.558 23.821,22.377 23.821,22.552 24.641,23.371 24.641,25.798 25.031,26.189 25.031,26.688 24.856,26.863 24.856,27.856 25.383,28.383 25.383,29.514 26.477,30.608 26.477,32.542 25.947,33.073 v1(25.947,33.704)
  Bottom Layer w0.127: v1(23.002,19.119) 23.043,19.16 25.659,19.16 26.065,19.565 27.128,19.565 27.156,19.593 29.747,19.593 30.664,18.676 32.351,18.676 34.441,16.586 37.326,16.586 37.714,16.975 43.262,16.975 43.33,16.908 45.093,16.908 45.169,16.983 48.608,16.983 48.661,16.931 50.396,16.931 51.213,17.748 53.444,17.748 54.487,16.705 56.448,16.705 61.418,21.675 74.588,21.675 74.958,21.304 75.318,21.304 75.603,21.589 75.603,21.933 75.805,22.135 I2S2_CK.X@75.805,22.859
PI2: IS2S_SDI.X J5.16 U1.B15 | length 106
  Top Layer w0.127: v1(26.557,34.643) 26.557,34.027 26.994,33.589 27.594,33.589 28.196,34.191 28.196,35.191 28.872,35.866 29.826,35.866 30.647,35.045 31.914,35.045 32.013,34.946 32.81,34.946 34.123,33.634 34.555,33.634 35.011,33.177 35.552,33.177 35.702,33.177 U1.B15@36.126,32.753 ; v1(76.137,21.412) 76.484,21.759 85.225,21.759 85.625,22.159 J5.16@85.625,22.859 ; J5.16@86.145,22.859 v1@86.925,22.079
  Int3 w0.127: v1(22,19.488) 22.232,19.72 22.451,19.72 22.602,19.871 22.602,21.517 23.539,22.454 23.539,22.628 24.387,23.477 24.387,25.814 23.986,26.215 23.43,26.771 23.43,28.017 26.223,30.81 26.223,32.437 25.557,33.104 25.557,33.866 25.919,34.228 26.142,34.228 v1(26.557,34.643)
  Bottom Layer w0.127: v1(22,19.488) 22,18.968 22.24,18.728 23.552,18.728 23.729,18.906 25.764,18.906 26.17,19.311 29.67,19.311 30.559,18.422 32.246,18.422 34.336,16.332 37.431,16.332 37.82,16.721 43.157,16.721 43.224,16.654 45.199,16.654 45.274,16.729 48.503,16.729 48.556,16.677 50.501,16.677 51.319,17.494 53.339,17.494 54.42,16.413 56.569,16.413 61.577,21.421 74.482,21.421 74.853,21.05 75.739,21.05 76.101,21.412 v1(76.137,21.412) ; v1(86.925,22.059) 86.946,22.08 86.946,22.359 87.446,22.859 IS2S_SDI.X@89.345,22.859
PI3: I2S2_SDO.X J5.17 U1.C14 | length 111.8
  Top Layer w0.127: U1.C14@36.926,31.953 v1(37.326,32.353) ; v1(76.382,19.733) 76.968,20.319 J5.17@79.525,20.319
  Int3 w0.127: v1(19.923,14.395) 19.143,14.395 18.871,14.123 18.464,14.123 17.602,14.986 17.602,18.119 18.348,18.865 19.623,18.865 20.066,19.307 20.066,21.513 20.212,21.659 22.384,21.659 23.285,22.559 23.285,24.353 22.631,25.007 22.631,27.578 25.826,30.773 25.826,32.282 v1(25.822,32.286)
  Bottom Layer w0.127: v1(19.923,14.395) 19.997,14.395 20.085,14.307 21.962,14.307 22.457,14.801 22.457,17.274 23.834,18.652 25.937,18.652 26.342,19.057 29.565,19.057 30.454,18.168 32.141,18.168 34.231,16.078 37.536,16.078 37.925,16.467 43.052,16.467 43.119,16.4 45.304,16.4 45.379,16.475 48.398,16.475 48.451,16.423 50.607,16.423 51.424,17.24 53.234,17.24 54.333,16.14 56.682,16.14 61.709,21.167 74.377,21.167 75.205,20.339 75.785,20.339 I2S2_SDO.X@75.805,20.319 76.382,19.742 v1(76.382,19.733) ; v1(25.822,32.286) 24.628,32.286 24.1,32.814 24.1,33.197 24.998,34.095 26.987,34.095 27.198,33.884 28.074,33.884 28.235,34.045 30.535,34.045 31.245,33.336 31.415,33.336 32.125,32.626 32.754,32.626 32.966,32.838 36.71,32.838 37.059,32.489 37.116,32.489 37.252,32.353 v1(37.326,32.353)
PI4: DOUT5.X J6.11 U1.A4 | length 30.1
  Top Layer w0.127: J6.11@17.042,25.399 v1(17.042,26.342) ; J6.11@17.342,25.399 18.115,26.172 18.605,26.172 18.777,26.345 19.05,26.345 v1(19.063,26.358) ; v1(25.246,27.026) 25.285,26.987 25.285,26.532 25.984,25.833 25.984,23.086 27.542,21.528 30.289,21.528 30.827,22.066 32.339,22.066 32.876,22.603 32.876,23.055 33.266,23.445 33.459,23.638 33.539,23.638 34.347,23.639 34.663,23.955 U1.A4@35.326,23.953
  Bottom Layer w0.127: DOUT5.X@13.322,25.399 14.266,26.342 v1(17.042,26.342) ; v1(19.063,26.358) 19.576,26.871 23.134,26.871 23.869,26.136 24.931,26.136 25.246,26.451 v1(25.246,27.026)
PI5: J6.5 U1.A3 VSYNC.X | length 32.7
  Top Layer w0.127: J6.5@17.468,33.019 17.603,32.884 17.603,32.393 v1(18.071,31.924) ; v1(24.567,28.601) 24.856,28.312 24.856,26.863 25.031,26.688 25.031,26.426 25.701,25.757 25.701,22.969 27.396,21.274 30.402,21.274 30.94,21.812 33.121,21.812 33.175,21.758 34.033,21.758 34.414,22.139 34.414,22.447 35.085,23.117 35.291,23.117 U1.A3@35.326,23.153
  Bottom Layer w0.127: VSYNC.X@13.322,33.019 13.824,32.517 17.56,32.517 17.963,32.114 17.963,32.107 18.071,31.998 v1(18.071,31.924) 21.331,31.924 22.584,30.672 22.584,29.35 23.333,28.601 v1(24.567,28.601)
PI6: DOUT6.X J6.10 U1.A2 | length 21.8
  Top Layer w0.127: J6.10@22.842,27.939 23.692,27.939 23.915,27.715 23.915,27.234 23.836,27.154 v1(23.836,27.08) 24.157,26.759 24.157,26.389 25.102,25.444 25.102,22.768 27.104,20.766 30.613,20.766 31.151,21.304 32.911,21.304 32.965,21.25 34.243,21.25 34.951,21.957 34.951,21.977 U1.A2@35.326,22.353
  Bottom Layer w0.127: v1(23.836,27.08) 23.836,27.085 24.313,27.562 24.769,27.562 25.126,27.919 26.842,27.919 DOUT6.X@26.862,27.939
PI7: DOUT7.X J6.9 U1.B3 | length 29.5
  Top Layer w0.127: J6.9@17.042,27.939 v1(17.042,28.842) ; J6.9@17.342,27.939 18.108,27.172 18.63,27.172 18.804,26.997 19.023,26.997 v1(19.063,26.958) ; v1(24.572,26.526) 25.418,25.681 25.418,22.852 27.25,21.02 30.508,21.02 31.046,21.558 33.016,21.558 33.07,21.504 34.138,21.504 34.697,22.062 34.697,22.255 35.171,22.728 35.702,22.728 U1.B3@36.126,23.153
  Bottom Layer w0.127: DOUT7.X@13.322,27.939 14.226,28.842 v1(17.042,28.842) ; v1(19.063,26.958) 19.115,27.01 19.356,27.01 19.471,27.125 23.239,27.125 23.838,26.526 v1(24.572,26.526)
PI8: U1.E4 U5.27 WIFI_HWAKE.X | length 95.7
  Top Layer w0.127: v1(13.915,46.29) U5.27@13.915,46.99 ; U1.E4@38.526,23.953 v1(38.926,23.553)
  Int3 w0.127: v1(13.915,46.29) 14.51,45.695 15.767,45.695 16.639,44.822 16.639,43.449 16.034,42.844 16.034,40.091 14.874,38.931 14.874,20.921 15.312,20.483 v1(15.312,17.342) ; v1(38.086,6.677) 38.038,6.725 38.038,7.035 38.034,7.038 38.034,7.393 38.595,7.953 38.595,9.392 40.506,11.304 40.506,21.157 41.717,22.368 41.717,22.934 41.488,23.162 40.247,23.162 40.117,23.293 40.117,23.715 39.888,23.943 39.564,23.943 39.199,23.578 38.951,23.578 v1(38.926,23.553)
  Bottom Layer w0.127: v1(15.312,17.342) 15.312,15.68 18.193,12.799 18.34,12.799 19.512,11.627 19.512,8.139 20.001,7.65 21.344,7.65 WIFI_HWAKE.X@21.362,7.633 21.178,7.449 21.178,5.834 22.248,4.764 24.356,4.764 25.7,3.42 25.7,2.3 26.7,1.3 38.884,1.3 39.303,1.72 39.303,5.002 38.086,6.219 v1(38.086,6.677)
PI9: JDIGITAL.22 U1.E2 | length 75.6
  Top Layer w0.127: v1(37.954,18.678) 37.954,18.752 37.812,18.893 37.812,19.138 38.936,20.261 38.936,21.943 38.926,21.953 U1.E2@38.526,22.353 ; v1(59.716,49.478) 60.014,49.18 74.593,49.18 JDIGITAL.22@76.226,50.813
  Int3 w0.127: v1(59.716,49.478) 59.716,49.462 59.894,49.283 59.894,48.211 59.753,48.07 59.753,47.055 60.866,45.942 60.866,24.013 v1(61.466,23.413)
  Bottom Layer w0.127: v1(37.954,18.678) 37.954,18.616 38.833,17.737 43.578,17.737 43.645,17.67 43.983,17.67 44.544,18.23 44.884,18.23 45.369,17.745 48.924,17.745 48.977,17.693 50.047,17.693 53.296,20.942 54.898,20.942 55.68,21.724 58.677,21.724 59.866,22.913 61.304,22.913 61.466,23.074 v1(61.466,23.413)
PI10: JSIDE.24 U1.F3 | length 92.7
  Top Layer w0.127: U1.F3@39.326,23.153 v1(39.726,22.753)
  Int2 w0.127: v1(35.224,11.729) 35.261,11.692 37.098,11.692 37.547,11.244 45.79,11.244 47.695,9.339 52.307,9.339 55.492,12.524 66.865,12.524 70.549,8.841 89.125,8.841 91.599,11.314 91.599,22.297 93.43,24.129 95.25,24.129 JSIDE.24@96.52,22.859
  Int3 w0.127: v1(35.224,11.729) 35,11.953 35,12.888 36.277,14.164 36.277,18.804 37.251,19.778 37.251,21.283 37.568,21.6 38.685,21.6 39.571,22.486 39.571,22.524 39.726,22.679 v1(39.726,22.753)
PI11: JSIDE.31 U1.F4 | length 92.8
  Top Layer w0.127: U1.F4@39.326,23.953 v1(39.726,23.553)
  Int2 w0.127: v1(34.705,11.05) 36.989,11.05 37.304,10.735 45.471,10.735 47.375,8.831 52.521,8.831 55.66,11.97 66.701,11.97 70.338,8.333 90.755,8.333 92.835,6.253 97.726,6.253 97.9,6.427 97.9,10.778 97.226,11.453 95.226,11.453 JSIDE.31@93.98,12.699
  Int3 w0.127: v1(34.705,11.05) 34.705,11.124 34.6,11.229 34.6,12.567 34.746,12.713 34.746,12.993 36.007,14.254 36.007,18.933 36.997,19.924 36.997,21.424 37.428,21.854 38.58,21.854 39.317,22.591 39.317,23.143 v1(39.726,23.553)
PI12: R11.2 RED.X U1.H1 | length 64.6
  Top Layer w0.127: R11.2@10.375,1 v1(11.1,1) ; v1(37.877,18.132) 37.951,18.132 38.106,18.287 38.116,18.287 38.285,18.457 38.285,18.46 38.36,18.535 38.36,19.238 39.222,20.1 40.341,20.1 40.926,20.685 U1.H1@40.926,21.553
  Int2 w0.127: v1(11.1,1) 10.2,1 9.75,1.45 9.75,6.95 10.572,7.772 12.777,7.772 13.739,6.81 21.06,6.81 21.432,7.182 21.92,7.182 22.085,7.017 v1(22.127,7.017)
  Int3 w0.127: v1(22.127,7.017) 22.65,7.54 22.65,10.184 22.396,10.438 22.396,13.244 22.44,13.288 22.44,13.612 23.993,15.165 23.993,19.293 v1(24.25,19.55)
  Bottom Layer w0.127: RED.X@6.122,2.553 7.125,1.549 10.551,1.549 v1(11.1,1) ; v1(24.25,19.55) 23.05,20.75 23.05,21.25 23.567,21.767 24.47,21.767 24.681,21.555 27.31,21.555 27.335,21.531 27.344,21.531 28.193,20.682 29.736,20.682 30.98,19.438 32.725,19.438 34.173,17.991 36.618,17.991 36.759,18.132 v1(37.877,18.132)